# EAGLE board 2026-08-06_v1_board (EAGLE 9.7.0)

Size 128.25 x 101.27 mm. Coordinates in mm from the lower left corner, seen from the top.
Outline: 0,1.27 128.25,0 128.25,100 0,101.27 0,1.27
Copper layers (1*16): Top / Bottom
Stack-up Default Layer Stack: Top SilkScreen Epoxy Ink / Top SolderMask SR:Green 0.0254mm Dk 4.3 / Top Surface Finish Lead-Free 0.02mm / Top CuFoil:007 0.035mm / Dielectric-1 User Defined 1.5mm / Bottom CuFoil:007 0.035mm / Bottom Surface Finish Lead-Free 0.02mm / Bottom SolderMask SR:Green 0.0254mm Dk 4.3 / Bottom SilkScreen Epoxy Ink
Design rules: minimum drill size 0.35mm, minimum copper width 6mil, keepout clearance 0mil, drill distance 6mil, via restrict clearance 0mil, dimension clearance 40mil, restrict clearance 0mil, copper clearance wire_polygon to wire_polygon 6mil, copper clearance wire_polygon to pad_smd 6mil, copper clearance wire_polygon to via 6mil, copper clearance pad_smd to pad_smd 6mil, copper clearance pad_smd to via 6mil, copper clearance via to via 6mil, copper clearance smd to pad (same net) 6mil, copper clearance smd to via (same net) 6mil, copper clearance smd to smd (same net) 6mil

## Footprints (pad centres in the part's own frame; a part is rotated, then mirrored left to right if it is on the bottom)
RESC1005X40 = smd 0.535 x 0.644: 1 -0.507,0; 2 0.507,0
INDC1006X60N = smd 0.56 x 0.729: 1 -0.485,0; 2 0.485,0
CAPMP3216X180N = smd 1.796 x 1.189: 1 -1.31,0; 2 1.31,0
CAPC1005X60 = smd 0.56 x 0.629: 1 -0.485,0; 2 0.485,0
NEUTRIK_NCJ6FI-H = drill 1.2 square: 1 6.1,18.4 | drill 1.2: 2 -6.1,18.4; 3 0,18.4; G 0,11.1; R 5.2,14.5; S -5.2,11.1; T -9.2,25 | hole 2.1: 4,7
TO92 = drill 0.813 octagon: 1 -1.27,0; 2 0,1.905; 3 1.27,0
PTV09A-X = drill 1: 1 -2.5,-7; 2 0,-7; 3 2.5,-7 | drill 2.4 slot 3.124 rotated 90: P$1 -4.4,0; P$2 4.4,0
SWITCH-SPDT-PTH-8.5X3.7MM = drill 1.016 pad 1.88: 1 -2.54,0; 2 0,0; 3 2.54,0
MODULE_DM-OLED096-636 = drill 1 square: 1 -3.81,11.5 | drill 1: 2 -1.27,11.5; 3 1.27,11.5; 4 3.81,11.5 | drill 2: S1 -11,11; S2 11,11; S3 11,-11; S4 -11,-11
MODULE_DEV-15583 = drill 1.02: 0 -7.62,13.97; 1 -7.62,11.43; 2 -7.62,8.89; 3 -7.62,6.35; 3.3V_1 -2.54,-16.51; 3.3V_2 7.62,11.43; 4 -7.62,3.81; 5 -7.62,1.27; 6 -7.62,-1.27; 7 -7.62,-3.81; 8 -7.62,-6.35; 9 -7.62,-8.89; 10 -7.62,-11.43; 11 -7.62,-13.97; 12 -7.62,-16.51; 13 7.62,-16.51; 14 7.62,-13.97; 15 7.62,-11.43; 16 7.62,-8.89; 17 7.62,-6.35; 18 7.62,-3.81; 19 7.62,-1.27; 20 7.62,1.27; 21 7.62,3.81; 22 7.62,6.35; 23 7.62,8.89; G1 -7.62,16.51; G2 0,-16.51; G3 7.62,13.97; ON-OFF 5.08,-16.51; PGM 2.54,-16.51; VBAT -5.08,-16.51; VIN 7.62,16.51
XL6009_FOOT = drill 1.016 square: IN+ 0,20.574; IN- 0,0; OUT+ 45.974,20.574; OUT- 45.974,0
DD1718PA_FOOT = drill 0.6 square: P$1 0,0; P$2 1.27,0; P$3 2.54,0; P$4 3.81,0; P$5 5.08,0
DIP826W53P254L959H508Q8B = drill 0.786 pad 1.386: 1 -4.13,3.81; 2 -4.13,1.27; 3 -4.13,-1.27; 4 -4.13,-3.81; 5 4.13,-3.81; 6 4.13,-1.27; 7 4.13,1.27; 8 4.13,3.81

## Placement (x,y rotation side)
1KΩ  [RESC1005X40]  88.9,46.99 0 top
1KΩ1  [RESC1005X40]  26.67,41.91 0 top
1KΩ2  [RESC1005X40]  20.32,41.91 0 top
1KΩ4  [RESC1005X40]  13.97,41.91 0 top
1MΩ  [RESC1005X40]  93.98,46.99 0 top
1MΩ1  [RESC1005X40]  33.02,41.91 0 top
6.8MH  [INDC1006X60N]  73.66,41.91 0 top
6.8MH1  [INDC1006X60N]  81.28,41.91 0 top
6.81KΩ  [RESC1005X40]  40.64,41.91 0 top
6.81KΩ1  [RESC1005X40]  66.04,41.91 0 top
6.81KΩ2  [RESC1005X40]  57.15,41.91 0 top
6.81KΩ3  [RESC1005X40]  48.26,41.91 0 top
22µF  [CAPMP3216X180N]  6.35,46.99 0 top
22µF1  [CAPMP3216X180N]  31.75,46.99 0 top
22µF2  [CAPMP3216X180N]  25.4,46.99 0 top
22µF3  [CAPMP3216X180N]  19.05,46.99 0 top
47NF  [CAPC1005X60]  12.7,46.99 0 top
47NF1  [CAPC1005X60]  44.45,46.99 0 top
100NF  [CAPC1005X60]  38.1,46.99 0 top
100NF1  [CAPC1005X60]  82.55,46.99 0 top
100NF2  [CAPC1005X60]  74.93,46.99 0 top
100NF3  [CAPC1005X60]  67.31,46.99 0 top
100NF6  [CAPC1005X60]  59.69,46.99 0 top
100NF7  [CAPC1005X60]  52.07,46.99 0 top
470Ω  [RESC1005X40]  7.62,41.91 0 top
C1  [CAPMP3216X180N]  93.98,52.07 0 top
J1  NCJ6FI-H  [NEUTRIK_NCJ6FI-H]  16.51,3.81 0 top
J2  NCJ6FI-H  [NEUTRIK_NCJ6FI-H]  78.74,3.81 0 top
Q1  NPN  [TO92]  88.9,41.91 0 top
R1  PTV09A-40-B20220F  [PTV09A-X]  104.14,12.7 0 top
R3  PTV09A-40-B20220F  [PTV09A-X]  40.64,12.7 0 top
R14  PTV09A-40-B20220F  [PTV09A-X]  106.68,86.36 0 top
S1  TOGGLE  [SWITCH-SPDT-PTH-8.5X3.7MM]  118.11,11.43 0 top
S2  TOGGLE  [SWITCH-SPDT-PTH-8.5X3.7MM]  55.88,11.43 0 top
U1  DM-OLED096-636  [MODULE_DM-OLED096-636]  111.76,45.72 0 top
U2  DEV-15583  [MODULE_DEV-15583]  13.97,80.01 0 top
U$1  XL6009_BOOST  [XL6009_FOOT]  40.64,74.93 0 top
U$2  DD1718PA_BOOST  [DD1718PA_FOOT]  40.64,58.42 0 top
U$3  OPAMP_DIP  [DIP826W53P254L959H508Q8B]  88.9,62.23 0 top
U$5  OPAMP_DIP  [DIP826W53P254L959H508Q8B]  77.47,62.23 0 top
U$6  OPAMP_DIP  [DIP826W53P254L959H508Q8B]  66.04,62.23 0 top

## Library data of the parts
1KΩ 1KΩ1 1KΩ2 1KΩ4 1MΩ 1MΩ1 6.81KΩ 6.81KΩ1-6.81KΩ3 470Ω = Tutorial - Fusion 360; CATEGORY: Resistor; SUB-CATEGORY: Fixed
6.8MH 6.8MH1 = Tinkercad; CATEGORY: Inductor; SUB-CATEGORY: Fixed
22µF 22µF1-22µF3 C1 = Capacitor; CATEGORY_L1: Capacitor; CATEGORY_L2: Tantalum Capacitors; CATEGORY_L3: Polymer Capacitors; PACKAGE: Surface Mount; PACKAGE_SIZE: 1206
47NF 47NF1 100NF 100NF1-100NF3 100NF6 100NF7 = Capacitor; CATEGORY_L1: Capacitor; CATEGORY_L2: Ceramic Capacitors; CATEGORY_L3: MLCC; PACKAGE: Surface Mount; PACKAGE_SIZE: 0402
J1 J2 = NCJ6FI-H; AVAILABILITY: In Stock; CHECK_PRICES: https://www.snapeda.com/parts/NCJ6FI-H/Neutrik/view-part/?ref=eda; DESCRIPTION: 3 pole XLR female receptacle with 1/4 stereo jack without switching contact, horizontal PCB mount; MF: Neutrik; MP: NCJ6FI-H; PACKAGE: None; PRICE: None; SNAPEDA_LINK: https://www.snapeda.com/parts/NCJ6FI-H/Neutrik/view-part/?ref=snap
Q1 = Tinkercad; CATEGORY: Transistor; SUB-CATEGORY: BJT; TYPE: NPN
R1 R3 R14 = Resistor; CATEGORY_L1: Potentiometers; CATEGORY_L2: Variable Resistors; CATEGORY_L3: Rotary Potentiometers; DATASHEET: https://www.bourns.com/docs/Product-Datasheets/PTV09.pdf; DESCRIPTION: 2k Ohm 1 Gang Linear Through Hole Snap In Potentiometer 1.0 Turns Carbon 0.05W 1/20W PC Pins Board Locks; MANUFACTURER: Bourns Inc.; MPN: PTV09A-4020F-B202; OPERATING_TEMPERATURE: -10°C ~ 50°C; PACKAGE: Through Hole; PACKAGE_SIZE: NA; PART_STATUS: Active; ROHS: Compliant; SERIES: Pro Audio PTV09; TEMPERATURE_COEFFICIENT: NA; THERMALLOSS: 0.05 W; TOLERANCE: ±20%
S1 S2 U$3 U$5 U$6 = Tinkercad
U1 = DM-OLED096-636; AVAILABILITY: Not in stock; CHECK_PRICES: https://www.snapeda.com/parts/DM-OLED096-636/Display+Module/view-part/?ref=eda; DESCRIPTION: 0.96” 128 X 64 MONOCHROME GRAPHIC OLED DISPLAY MODULE - I2C; MF: Display Module; MP: DM-OLED096-636; PACKAGE: Package; PRICE: None; SNAPEDA_LINK: https://www.snapeda.com/parts/DM-OLED096-636/Display+Module/view-part/?ref=snap
U2 = DEV-15583; AVAILABILITY: In Stock; CHECK_PRICES: https://www.snapeda.com/parts/DEV-15583/SparkFun/view-part/?ref=eda; DESCRIPTION: RT1062 Teensy 4.0 series ARM® Cortex®-M7 MPU Embedded Evaluation Board; MF: SparkFun Electronics; MP: DEV-15583; PACKAGE: None; PRICE: None; SNAPEDA_LINK: https://www.snapeda.com/parts/DEV-15583/SparkFun/view-part/?ref=snap
U$1 U$2 = Library

## Nets
3.3V_1: U2.3.3V_1
G: J1.G J2.G
G1: U2.G1
G2: U2.G2
N$1: U2.VIN U$1.IN+ U$2.P$1
N$2: R14.3 U1.1 U2.G3 U$1.IN- U$2.P$2
N$3: 1MΩ1.2 1MΩ.1 47NF1.2 47NF.2 100NF1.1 100NF2.2 100NF3.1 100NF6.1 100NF7.2 100NF.2 C1.2 J1.1 J1.S J2.1 J2.S U$1.OUT- U$2.P$4 U$5.5 U$6.5
N$4: 1MΩ.2 100NF2.1 100NF7.1 100NF.1 U$2.P$5 U$3.4 U$5.4 U$6.4
N$5: J1.T U$3.3
N$6: 6.8MH1.1 6.8MH.2 47NF1.1
N$7: 6.8MH1.2 47NF.1 470Ω.1 Q1.1
N$8: 6.8MH.1 U$1.OUT+
N$9: 470Ω.2 C1.1 Q1.2
N$10: Q1.3 S1.2 S2.2
N$11: 6.81KΩ1.1 6.81KΩ.1 S2.1
N$12: 6.81KΩ2.1 6.81KΩ3.1 S1.1
N$13: 100NF1.2 100NF3.2 100NF6.2 U$2.P$3 U$3.8 U$5.7 U$6.7
N$14: 1MΩ1.1 J2.T U$3.5
N$15: 22µF.1 J1.2
N$16: 22µF1.1 J1.3
N$17: R14.2 U2.15
N$18: R14.1 U1.2 U2.3.3V_2
N$19: U1.3 U2.19
N$20: U1.4 U2.18
N$21: 22µF.2 U$5.3
N$22: 22µF1.2 U$5.2
N$23: R1.1 U$5.1
N$24: R1.2 R1.3 U$5.8
N$25: 1KΩ.1 U$5.6
N$26: 1KΩ.2
N$27: 1KΩ2.1 U$3.1 U$3.2
N$28: 1KΩ1.1 U$3.6 U$3.7
N$29: 1KΩ2.2
N$30: 22µF2.1 J2.2
N$31: 22µF3.1 J2.3
N$32: 22µF2.2 U$6.3
N$33: 22µF3.2 U$6.2
N$34: R3.1 U$6.1
N$35: R3.2 R3.3 U$6.8
N$36: 1KΩ4.1 U$6.6
N$37: 1KΩ4.2
N$38: 1KΩ1.2
N$39: 6.81KΩ2.2
N$40: 6.81KΩ3.2
N$42: 6.81KΩ1.2
VBAT: U2.VBAT

## Tracks (layer width: path | path; a pad name or v marks a point on that pad's centre or on a via)
G  (1 unrouted)
N$1  (2 unrouted)
N$2  (4 unrouted)
N$3  (18 unrouted)
N$4  (7 unrouted)
N$5  (1 unrouted)
N$6  (2 unrouted)
N$7  (3 unrouted)
N$8  (1 unrouted)
N$9  (2 unrouted)
N$10  (2 unrouted)
N$11  (2 unrouted)
N$12  (2 unrouted)
N$13  (6 unrouted)
N$14  (2 unrouted)
N$15  (1 unrouted)
N$16  (1 unrouted)
N$17  (1 unrouted)
N$18  (2 unrouted)
N$19  (1 unrouted)
N$20  (1 unrouted)
N$21  (1 unrouted)
N$22  (1 unrouted)
N$23  (1 unrouted)
N$24  (2 unrouted)
N$25  (1 unrouted)
N$27  (2 unrouted)
N$28  (2 unrouted)
N$30  (1 unrouted)
N$31  (1 unrouted)
N$32  (1 unrouted)
N$33  (1 unrouted)
N$34  (1 unrouted)
N$35  (2 unrouted)
N$36  (1 unrouted)